# Altium PCB RT_SUPER_C1.PCBdoc (part 2 of 3)
Units mil, origin at the board's own origin, x right, y up, seen from the top; angles counter-clockwise.
Board outline 1450 x 1450 mil, 6 copper layers (Top Layer, GND2, PWR3, PWR4, GND5, Bottom Layer), stack 39.512 mil thick; 158 components, 116 nets, 476 pads, 207 vias.
Unrouted connection lines stored in the file: 5.
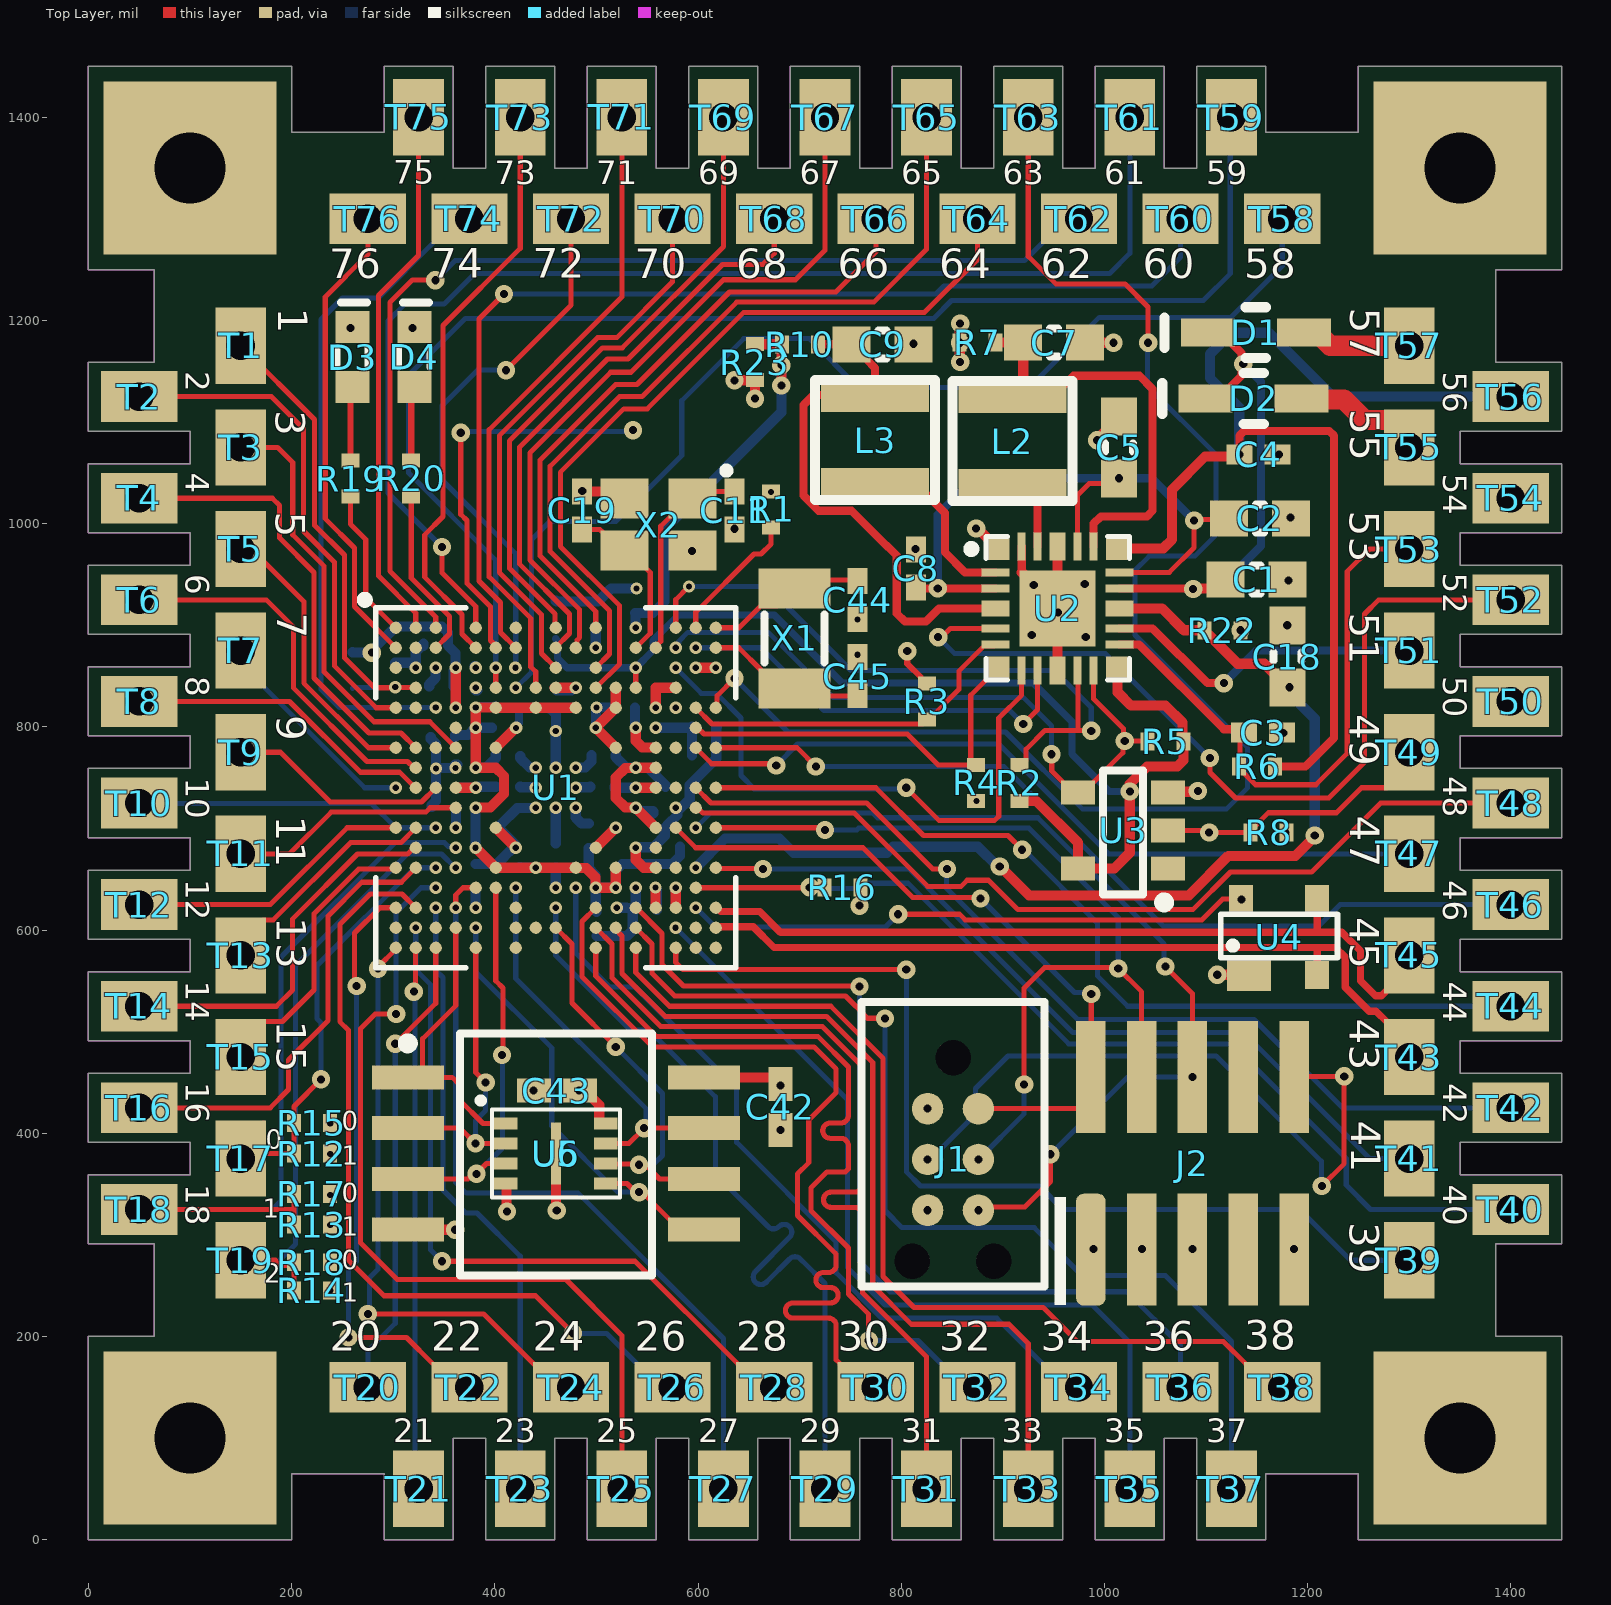
[diagram p0: Top Layer view]

## Via types
v1: diameter 18, hole 8, Top Layer to Bottom Layer, tented both sides, 116 vias
v2: diameter 12, hole 6, Top Layer to Bottom Layer, tented both sides, 91 vias

## Nets (pads, with @x,y where several pads share a name; then routed paths per layer and width w, separated by ;. In a path a pad name is that pad's centre, name@x,y a point inside that pad or via, vN(x,y) a via of type N, cw(c..) or ccw(c..) an arc to the next point about the centre after c; other vN are vias at no path point) (continued)
+1v8-AO: (continued)
  Top Layer w10: R2.2@916.38,727.01 916.55,726.84 933.16,726.84 974.14,685.86 U3.5@974.14,660.62 1009.62,660.62 1025,676 v1(1025,736.37) 1025,743.78 1042.22,761 1071.82,761 1077.68,766.86 R5.2@1077.68,785.41 ; U2.12@1013.03,857.56 1013,834 1026,821 1060,821 1077,804 1077,786.09 R5.2@1077.68,785.41 ; R5.2@1075.79,787.3 R5.2@1077.68,785.41
  Bottom Layer w7: C10.2@460,886.65 461.54,885.11 461.54,867.46 470.89,858.11 v2(538.74,858.11) 555.8,875.17 555.8,885.12 580.68,910 675,910 742,843 930,843 968,805 968,773.06 1004.69,736.37 v1(1025,736.37)
+3v3: C18.2 R22.1 U1.N16 U2.15 | length 1030
  Top Layer w10: v1(897,662.5) 897.5,662.5 926,634 1083,634 1122,673 1188,673 1207,692 v1(1207,693) ; U2.15@1015,916.61 1056.62,916.61 1078.23,895 R22.1@1098.28,895 ; R22.1@1098.28,893.03 1100.17,891.14 1102.14,891.14 1131.28,862 1157.47,862 1180,839.47 C18.2@1180,838.49 1180.98,838.49 1181.49,839 v1(1182,839)
  Bottom Layer w10: v2(597.8,661.26) 626.54,690 680,690 694,676 786,676 792,682 875.49,682 894.99,662.5 v1(897,662.5) ; v1(1182,839) 1183.53,837.47 1183.53,831.47 1207,808 v1(1207,693)
+5vUSB: D2.1 T55.1 U1.R16 U4.4 | length 1241.6
  Top Layer w5: v1(797,615.5) 857.5,615.5 863,610 1096,610 1116.44,630.44 U4.4@1134.5,630.44 v1(1135,630)
  Top Layer w20: D2.1@1194.12,1123.21 1195.18,1122.16 1235.84,1122.16 1256.04,1101.96 1285,1101.96 1300,1086.96 T55.1@1300,1075
  PWR4 w5: T55.1@1296.43,1071.43 T55.1@1300,1075
  PWR4 w12: v1(1135,630) 1153,648 1153,838.28 1234,919.28 1234,1056 1255,1077 1298,1077 T55.1@1300,1075
  Bottom Layer w5: v2(597.8,621.89) 597.97,621.89 616.86,603 784.5,603 v1(797,615.5)
+VBATT: C4.2 R6.2 T56.1 U2.18 | length 1114.1
  Top Layer w8: C4.2@1135.73,1068.11 v1(1132.78,1068.11) 1132.78,1086.54 1137.46,1091.22 1221.31,1091.22 1226,1086.54 1226,789 1198.01,761.01 R6.2@1168.04,761.01
  Top Layer w10: U2.18@1013.03,975.67 1057.89,975.67 1066.66,984.43 1066.66,1033.58 1099.07,1065.99 1130.65,1065.99 v1(1132.78,1068.11)
  Bottom Layer w10: v1(1132.78,1068.11) 1132.78,1114.28 1103.8,1143.25 1103.8,1166.8 1124.94,1187.94 1162.06,1187.94 1225,1125 T56.1@1400,1125
+VBATT_BU: C3.2 R6.1 T53.1 U2.13 | length 563.2
  Top Layer w5: C3.2@1133.59,792.87 1133.59,761.99 R6.1@1132.6,761.01 1132.6,759.04 1148.64,743 1208,743 1239,774 1239,953 1261,975 T53.1@1300,975
  Top Layer w8: U2.13@1015,881.18 1033.9,881.18 1117.41,797.66 1128.73,797.66 1130.84,795.55 C3.2@1130.84,792.87
+VDDIO: C12.2 C13.2 C14.2 C15.2 C16.2 C17.2 C20.2 C21.2 C22.2 C23.2 C24.2 C25.2 C42.1 C43.1 J1.1 J2.1 R3.2 R4.2 R8.2 R12.2 R13.2 R14.2 R22.2 R23.2 T50.1 U1.E6 U1.E8 U1.E10 U1.F5 U1.H5 U1.H13 U1.H14 U1.K5 U1.K13 U1.L14 U1.M5 U1.N6 U1.N8 U1.N10 U1.N12 U1.P11 U1.P12 U5.8 U6.8 | length 1157.8
  Top Layer w6: v1(805.91,874.45) 805.91,862.12 819.46,848.57 819.46,846.61 823.35,842.72 R3.2@825.31,842.72 ; R4.2@873.76,727 v2(874,727) ; R22.2@1133.72,895 v1(1134,895)
  Top Layer w8: R14.2@237.72,245 v2(238,245) ; R13.2@237.72,310 238,309.72 v2(238,309.52) ; J2.1@986.67,285.42 987.33,286.09 v1(989.41,286.09)
  Top Layer w10: v2(381,681) U1.M5@381.26,680.94 U1.M5@381.26,680.94 U1.N6@400.94,661.26 v2(440.32,661.26) U1.N10@479.69,661.26 480.07,660.88 490.12,660.88 498.99,652.01 498.99,641.96 v2(499.37,641.57) v2(519.06,641.57) U1.N12@519.06,661.26 ; v2(381.26,720.31) 381.64,720.7 395.7,720.7 409,734 409,751.63 400.94,759.68 v2(381.26,759.68) v2(381.26,799.06) v2(381.26,819.12) 400.56,819.12 U1.E6@400.94,818.74 U1.E8@440.32,818.74 U1.E10@479.69,818.74 ; v1(483,442) 488.56,442 502.71,427.85 502.71,410.43 503.62,409.53 U5.8@509.21,409.53 ; v2(538.74,720.31) U1.L14@558.43,700.63 ; U1.K13@539.66,720 538.97,720.7 528.3,720.7 519.06,729.94 519.06,750.06 528.3,759.3 538.36,759.3 v2(538.74,759.68) U1.H14@558.43,759.68 ; U6.8@605.67,455 674.64,455 C42.1@681,448.64 v1(681,447) ; v1(636,1141) 636.14,1141.14 655.86,1141.14 R23.2@656,1141.28 v1(656,1123)
  Bottom Layer w10: C16.2@361,790 361,791.81 361.08,791.89 373.55,791.89 380.72,799.06 v2(381.26,799.06) ; v2(381,681) C20.2@381,701 381.08,701.08 381.08,720.13 v2(381.26,720.31) ; v2(381.26,759.68) 381.64,760.07 391.88,760.07 401,769.19 C21.2@401,771 401,772.81 C21.2@400.92,772.89 ; v2(381.26,819.12) 381.64,819.51 400.41,819.51 400.49,819.58 C17.2@400.49,820.12 ; v2(381.26,799.06) C13.2@396.97,799.03 ; C24.2@425,662 425,661.71 425.08,661.63 439.94,661.63 v2(440.32,661.26) ; C15.2@492.48,680.76 492.48,660.68 498.99,654.17 498.99,641.96 v2(499.37,641.57) ; C12.2@500,618 499.37,618.63 v2(499.37,641.57) ; C22.2@519,772 519,770.19 529.12,760.07 538.36,760.07 v2(538.74,759.68) 539.12,759.3 551.39,759.3 567.88,742.81 C25.2@567.88,741 ; v2(538.74,720.31) 539.28,720.31 542.71,716.89 555.8,716.89 555.88,716.81 C23.2@555.88,715 ; C14.2@582.24,681.93 582.24,672.86 574.32,664.94 525.3,664.94 519.44,659.09 519.44,641.96 v2(519.06,641.57) v2(499.37,641.57)
  other v1: 826,424.15
  other v2: 238,379.61 1179.38,696.05
+VIN: D1.1 T57.1 | length 109.1
  Top Layer w20: D1.1@1196.24,1188 1209.04,1188 1222.04,1175 T57.1@1300,1175
+VREF: C6.2 R21.2 T1.1 U1.D2 | length 474.6
  Top Layer w5: T1.1@150,1175 222.62,1102.38 222.62,998.38 252,969 252,868 281.57,838.43 301.43,838.43 v2(302,839) 302.29,838.71 321.92,838.71 U1.D2@322.2,838.43
  Bottom Layer w5: R21.2@260,838 260.5,838.5 301.5,838.5 v2(302,839)
ADC0-1: T74.1 U1.E3 | length 671.7
  Bottom Layer w5: v2(341.89,818.89) 247.11,818.89 229,837 229,1201 250,1222 285,1222 340,1277 340,1277.5 362.5,1300 T74.1@375,1300
ADC0-3: T75.1 U1.A2 | length 534.2
  Top Layer w5: U1.A2@322.2,897.48 322.2,911.8 285.41,948.59 285.41,1224.41 325,1264 T75.1@325,1400
ADC0-4: T73.1 U1.B5 | length 582
  Top Layer w5: U1.B5@381.26,877.8 367.76,891.3 367.76,910.52 331,947.28 331,989 349,1007 349,1195 425,1271 T73.1@425,1400
ADC0-8: T2.1 U1.E1 | length 498.3
  Top Layer w5: T2.1@53,1125 180,1125 211.62,1093.38 211.62,1060.88 211.62,992.66 242,962.28 242,860 283.26,818.74 U1.E1@302.52,818.74
  Top Layer w6: T2.1@50,1125 T2.1@53,1125
ADC0-12: T76.1 U1.B1 | length 468.3
  Top Layer w5: T76.1@275,1300 275,1265 233.12,1223.12 233.12,1004.88 262,976 262,918.31 U1.B1@302.52,877.8
FC0-CLK: T5.1 U1.G1 | length 280.6
  Top Layer w5: T5.1@150,975 160.29,975 212,923.29 212,843 275.63,779.37 U1.G1@302.52,779.37
FC0-RXD: T3.1 U1.G4 | length 436.7
  Top Layer w5: T3.1@150,1075 186.31,1075 201.12,1060.18 201.12,989.02 232,958.14 232,854 281,805 335.94,805 U1.G4@361.57,779.37